# Altium PCB ublox_gnss_node.PcbDoc (part 2 of 5)
Units mm, origin at the board's own origin, x right, y up, seen from the top; angles counter-clockwise.
Board outline 84 x 108.04 mm, 6 copper layers (Top Layer (HSig), L2 GND, L3 Signal X, L4 PWR, L5 GND, Bottom Layer (Y)), stack 1.538 mm thick; 222 components, 159 nets, 892 pads, 1025 vias.
Unrouted connection lines stored in the file: 345.
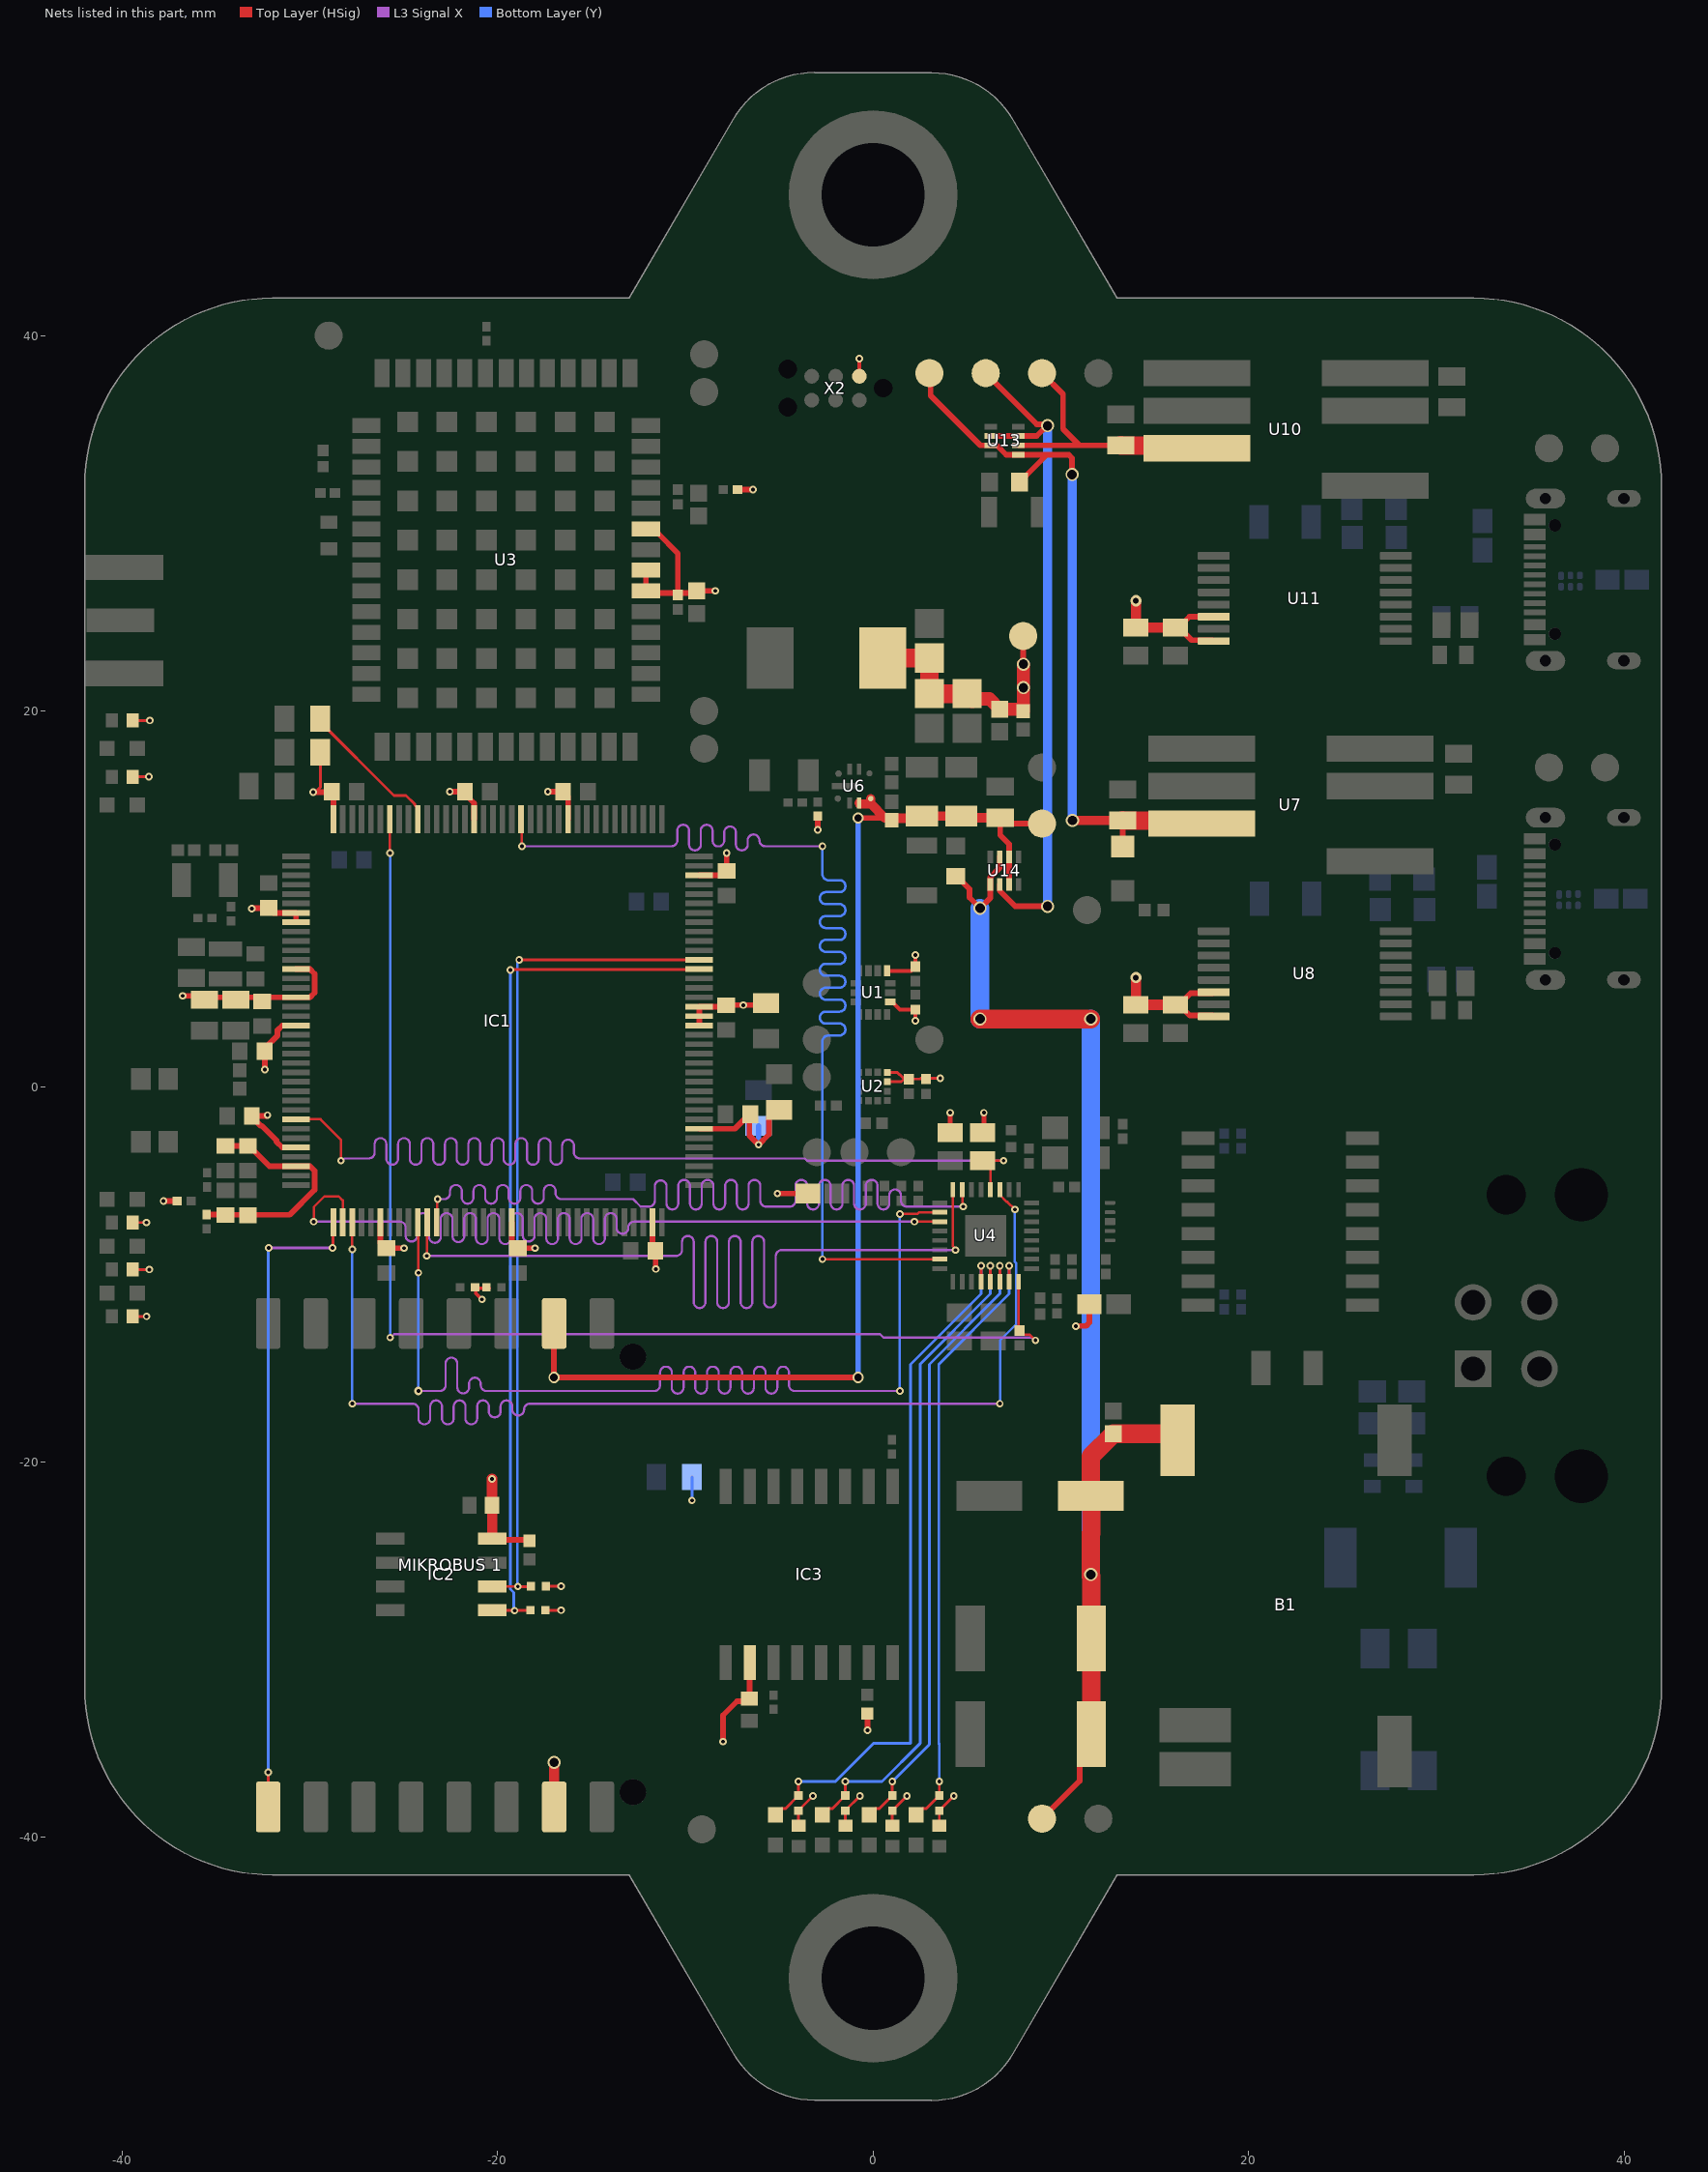
[diagram p6: the nets of this part, all layers, seen from the top]

## Part data
B1: "Power over Ethernet - PoE PD Module, Isolated DC-DC converter, IEEE802.3af compliant, Over Temp. Protection, Ind Temp. Range, Small Footprint, SMT. (Blocks not pins).", Manufacturer Name=Silvertel, Mouser Part Number=480-AG9905-MTB, Datasheet Link=https://www.silvertel.com/images/datasheets/Ag9900M-datasheet-ultra-miniature-isolated-Power-over-Ethernet-POE-module.pdf, Geometry.Height=13.05mm, Manufacturer Part Number=AG9905-MTB, Mouser Price/Stock=https://www.mouser.co.uk/ProductDetail/Silvertel/AG9905-MTB?qs=vvQtp7zwQdPQM58WrfW9tQ%3D%3D
C1 C4: library part CMP-1034-02114-1, "CAP 1uF  0402 (1005 Metric)", Case Code (Imperial)=0402, Case Code (Metric)=1005, Dielectric=X6S, Manufacturer=Murata, Manufacturer Part Number=GRM155C81C105KE11D, Max Operating Temperature=105°C, Min Operating Temperature=-55°C, Package Quantity=10000, Resistor Type=Ceramic, Supplier Part Number 1=490-12700-1-ND, Tolerance=10%, Voltage Rating=16V, Case/Package=0402, Category="Ceramic Capacitors", ComponentLink1Description=http://www.mouser.com/ds/2/281/c02e-2905.pdf?src-supplier=Mouser, ComponentLink1URL=http://www.mouser.com/ds/2/281/c02e-2905.pdf?src-supplier=Mouser, ComponentLink2Description=http://search.murata.co.jp/Ceramy/image/img/A01X/G101/ENG/GRM155C81C105KE11-01.pdf?src-supplier=Digi-Key, ComponentLink2URL=http://search.murata.co.jp/Ceramy/image/img/A01X/G101/ENG/GRM155C81C105KE11-01.pdf?src-supplier=Digi-Key, Height=0.5mm, Lead Free="Lead Free", Length=0.039inch, Mount="Surface Mount", Packaging="Tape and Reel", Pricing 1="1=0.29000, 10=0.19700, 50=0.11840, 100=0.09990, 500=0.06836, 1000=0.06047, 2500=0.05784, 5000=0.05258 (USD)", RoHS=Yes, RoHS Compliant=Yes, Stock 1=7199, Supplier 1=Digi-Key, Termination=SMD/SMT, Thickness=0.024inch, Voltage Rating (DC)=16V, Weight=0.000212oz, Width=0.5mm
C2 C3 C7 C9 C88: library part CMP-2008-03928-1, Manufacturer=Murata, Manufacturer Part Number=GRM155R71C104KA88J, Tolerance=10%, Part Number=GRM155R71C104KA88J
C5: library part CMP-1034-02087-2, Case Code (Imperial)=0402, Case Code (Metric)=1005, Dielectric=X7R, Manufacturer=Samsung, Manufacturer Part Number=CL05B224KO5NNNC, Max Operating Temperature=125°C, Min Operating Temperature=-55°C, Supplier Part Number=1276-1176-1-ND, Tolerance=10%, Voltage Rating=16V, Case/Package=0402, Category="Ceramic Capacitors", ComponentLink1Description=https://datasheet.ciiva.com/25800/cl05b224ko5nnnc-25800450.pdf?src-supplier=Digikey, ComponentLink1URL=https://datasheet.ciiva.com/25800/cl05b224ko5nnnc-25800450.pdf?src-supplier=Digikey, Construction=Flat, Depth=0.5mm, Height=0.5mm, Length=1mm, Material=4241ConductorMaterial, Mounting Technology="Surface Mount", Packaging="Tape and Reel", Pricing="1=0.1, 10=0.028, 50=0.0164, 100=0.0126, 500=0.0095, 1000=0.00747, 2500=0.00679, 5000=0.00625 (USD)", Radiation Hardening=No, RoHS=Yes, RoHS Compliant=Yes, Series=CL, Stock=1519601, Supplier=Digikey, Voltage Rating (DC)=16V
C8 C62 C63 C85: library part GRM188R61E106MA73D, "CAP CER 10UF 25V X5R 0603", Manufacturer=Murata, Supplier Part Number=490-7202-6-ND, Tolerance=20%, Category="Ceramic Capacitors", ComponentLink1Description=https://datasheet.ciiva.com/14906/partnumbering-e-01-14906429.pdf?src-supplier=Digi-Key, ComponentLink1URL=https://datasheet.ciiva.com/14906/partnumbering-e-01-14906429.pdf?src-supplier=Digi-Key, ComponentLink2Description=https://datasheet.ciiva.com/14906/partnumbering-e-01-14906431.pdf?src-supplier=Digi-Key, ComponentLink2URL=https://datasheet.ciiva.com/14906/partnumbering-e-01-14906431.pdf?src-supplier=Digi-Key, ComponentLink3Description=https://datasheet.ciiva.com/22776/608985-22776426.pdf?src-supplier=Farnell, ComponentLink3URL=https://datasheet.ciiva.com/22776/608985-22776426.pdf?src-supplier=Farnell, ComponentLink4Description=https://datasheet.ciiva.com/22776/c02e-22776427.pdf?src-supplier=Farnell, ComponentLink4URL=https://datasheet.ciiva.com/22776/c02e-22776427.pdf?src-supplier=Farnell, ComponentLink5Description=https://datasheet.ciiva.com/22619/c02e-22619674.pdf?src-supplier=Element14, ComponentLink5URL=https://datasheet.ciiva.com/22619/c02e-22619674.pdf?src-supplier=Element14, Manufacturer Part Number=GRM188R61E106MA73D, Pricing="1=0.26, 10=0.176, 50=0.1176, 100=0.0999, 500=0.07054, 1000=0.06173 (USD)", RoHS=Yes, Stock=3353344, Supplier=Digi-Key
C10 C12 C14: library part CL10B105KP8NNNC, "Capacitor 1uF 0603", Manufacturer_Name=SAMSUNG, Mouser Part Number=187-CL10B105KP8NNNC, Supplier Part Number 1=1276-1946-1-ND, Arrow Part Number=CL10B105KP8NNNC, Arrow Price/Stock=https://www.arrow.com/en/products/cl10b105kp8nnnc/samsung-electro-mechanics?region=europe, Datasheet Link=https://media.digikey.com/pdf/Data%20Sheets/Samsung%20PDFs/CL_Series_MLCC_ds.pdf, Height=0.9mm, Manufacturer Part Number=CL10B105KP8NNNC, Mouser Price/Stock=https://www.mouser.co.uk/ProductDetail/Samsung-Electro-Mechanics/CL10B105KP8NNNC?qs=X6jEic%2FHinD9krOsbkFZow%3D%3D, Supplier 1=Digikey
C11 C13 C16 C17 C18 C19 C20 C21 C22 C23 C24 C25 C28 C29 C30 C86 C87: library part CC0603KRX7R7BB104, "Capacitor 100nF 0603", Manufacturer_Name=YAGEO, Mouser Part Number=603-CC603KRX7R7BB104, Arrow Part Number=CC0603KRX7R7BB104, Arrow Price/Stock=https://www.arrow.com/en/products/cc0603krx7r7bb104/yageo?utm_currency=USD&region=europe, Datasheet Link=https://www.yageo.com/en/Chart/Download/pdf/CC0603KRX7R7BB104, Height=0.9mm, Manufacturer Part Number=CC0603KRX7R7BB104, Mouser Price/Stock=https://www.mouser.co.uk/ProductDetail/YAGEO/CC0603KRX7R7BB104?qs=AgBp2OyFlx8KPmNTlFoWXA%3D%3D, Supplier 1=Mouser, Supplier Part Number 1=603-CC603KRX7R7BB104
C15 C60 C61: library part CMP-2007-04522-1, Manufacturer="AVX Interconnect / Elco", Part Number=0805ZD226MAT2A
C26: library part 0603B221K500CT, "Capacitor 220pF 0603", Manufacturer_Name="Walsin Technology Corporation", Supplier Part Number 1=1292-1407-1-ND, Datasheet Link=http://www.passivecomponent.com/wp-content/uploads/datasheet/WTC_MLCC_General_Purpose.pdf, Height=0.87mm, Manufacturer Part Number=0603B221K500CT, Supplier 1=Digikey
C27 C32 C33 C66 C67 C74 C75: library part LMK212AB7106MG-T, "Capacitor 10uF 0805", Manufacturer_Name="TAIYO YUDEN", Mouser Part Number=963-LMK212AB7106MG-T, Supplier Part Number 1=587-3417-1-ND, Datasheet Link=https://datasheet.datasheetarchive.com/originals/distributors/Datasheets-DGA20/25674.pdf, Height=1.4mm, Manufacturer Part Number=LMK212AB7106MG-T, Mouser Price/Stock=https://www.mouser.co.uk/ProductDetail/Taiyo-Yuden/LMK212AB7106MG-T?qs=CNQs48zzdnrud19jlu61Cg%3D%3D, Supplier 1=Digikey
C31 C37 C41 C44 C45 C46 C47 C50 C55 C59 C64: library part GRM155R71H104KE14J, "Capacitor 100nF 0402 - storage", Case Code (Imperial)=0402, Case Code (Metric)=1005, Dielectric=X7R, Manufacturer=Murata, Max Operating Temperature=125°C, Min Operating Temperature=-55°C, Package Quantity=50000, Supplier Part Number 1=490-13342-1-ND, Tolerance=10%, Voltage Rating=50V, Case/Package=0402, Category="Ceramic Capacitors", ComponentLink1Description=http://search.murata.co.jp/Ceramy/image/img/A01X/G101/ENG/GRM155R71H104KE14-01.pdf?src-supplier=Mouser, ComponentLink1URL=http://search.murata.co.jp/Ceramy/image/img/A01X/G101/ENG/GRM155R71H104KE14-01.pdf?src-supplier=Mouser, ComponentLink2Description=http://search.murata.co.jp/Ceramy/image/img/A01X/G101/ENG/GRM155R71H104KE14-01.pdf?src-supplier=Digi-Key, ComponentLink2URL=http://search.murata.co.jp/Ceramy/image/img/A01X/G101/ENG/GRM155R71H104KE14-01.pdf?src-supplier=Digi-Key, ComponentLink3Description=http://search.murata.co.jp/Ceramy/image/img/A01X/G101/ENG/GRM155R71H104KE14-01.pdf?src-supplier=Avnet, ComponentLink3URL=http://search.murata.co.jp/Ceramy/image/img/A01X/G101/ENG/GRM155R71H104KE14-01.pdf?src-supplier=Avnet, ComponentLink4Description=http://search.murata.co.jp/Ceramy/image/img/A01X/G101/ENG/GRM155R71H104KE14-01.pdf?src-supplier=Avnet+Europe, ComponentLink4URL=http://search.murata.co.jp/Ceramy/image/img/A01X/G101/ENG/GRM155R71H104KE14-01.pdf?src-supplier=Avnet+Europe, Composition=Ceramic, Height=0.5mm, Lead Free="Lead Free", Length=0.039inch, Manufacturer Part Number=GRM155R71H104KE14J, Mount="Surface Mount", Packaging="Tape and Reel", Pricing 1="1=0.10000, 10=0.03800, 100=0.01680, 500=0.01198, 1000=0.00941, 2500=0.00855, 5000=0.00787 (USD)", RoHS=Yes, Stock 1=1916144, Supplier 1=Digi-Key, Termination=SMD/SMT, Thickness=0.022inch, Voltage Rating (DC)=50V, Weight=0.000212oz, Width=0.5mm
C34 C35: library part CMP-2008-04393-1, Manufacturer=Murata, Part Number=GRM1555C1H5R1CA01D
C36 C40 C53: library part GRM155R71H103KA88D, "Capacitor 10nF/50V 0402 - storage", Manufacturer_Name="Murata Electronics", Mouser Part Number=81-GRM155R71H103KA8D, Arrow Part Number=GRM155R71H103KA88D, Arrow Price/Stock=https://www.arrow.com/en/products/grm155r71h103ka88d/murata-manufacturing?utm_currency=USD&region=nac, Datasheet Link=https://search.murata.co.jp/Ceramy/image/img/A01X/G101/ENG/GRM155R71H103KA88-01A.pdf, Height=0.33mm, Manufacturer Part Number=GRM155R71H103KA88D, Mouser Price/Stock=https://www.mouser.co.uk/ProductDetail/Murata-Electronics/GRM155R71H103KA88D?qs=Dfh4SrgScWxOVlCuzd3ZyQ%3D%3D
C38 C42: library part GRM155R6YA105KE11D, "Capacitor 1uF/35V 0402 - storage", Manufacturer_Name="Murata Electronics", Mouser Part Number=81-GRM155R6YA105KE1D, Arrow Part Number=GRM155R6YA105KE11D, Arrow Price/Stock=https://www.arrow.com/en/products/grm155r6ya105ke11d/murata-manufacturing?region=europe, Datasheet Link=https://search.murata.co.jp/Ceramy/image/img/A01X/G101/ENG/GRM155R6YA105KE11-01A.pdf, Height=0.7mm, Manufacturer Part Number=GRM155R6YA105KE11D, Mouser Price/Stock=https://www.mouser.co.uk/ProductDetail/Murata-Electronics/GRM155R6YA105KE11D?qs=hNud%2FORuBR1Z%2F4J6kBsCGQ%3D%3D
C39 C43: library part GRM155R61A106ME11D, "Capacitor 10uF 0402 - storage", Manufacturer_Name="Murata Electronics", Mouser Part Number=81-GRM155R61A106ME1D, Arrow Part Number=GRM155R61A106ME11D, Arrow Price/Stock=https://www.arrow.com/en/products/grm155r61a106me11d/murata-manufacturing?utm_currency=USD&region=nac, Datasheet Link=https://search.murata.co.jp/Ceramy/image/img/A01X/G101/ENG/GRM155R61A106ME11-01A.pdf, Height=0.33mm, Manufacturer Part Number=GRM155R61A106ME11D, Mouser Price/Stock=https://www.mouser.co.uk/ProductDetail/Murata-Electronics/GRM155R61A106ME11D?qs=xZ%2FP%252Ba9zWqZMJSi57Q8OyA%3D%3D
C48 C49: library part C0402C220K5GACTU, "Capacitor 22pF 0402", Manufacturer_Name=KEMET, Mouser Part Number=80-C0402C220K5G, Arrow Part Number=C0402C220K5GACTU, Arrow Price/Stock=https://www.arrow.com/en/products/c0402c220k5gactu/kemet-corporation?region=nac, Datasheet Link=https://content.kemet.com/datasheets/KEM_C1002_X7R_SMD.pdf, Height=0.55mm, Manufacturer Part Number=C0402C220K5GACTU, Mouser Price/Stock=https://www.mouser.co.uk/ProductDetail/KEMET/C0402C220K5GACTU?qs=6dm3P68XlMDqaWSnHxY69A%3D%3D
C51 C52: library part CMP-1035-02328-1, "CAP 10nF 200V ±10% 0603 (1608 Metric) Thickness 1mm SMD", Case-EIA=0603, Case-Metric=1608, Manufacturer="Yageo Group", Manufacturer Part Number=C0603C103K2RAC, Rated Voltage="200 V", Tolerance=Â±10%, Max Thickness="1 mm", Technology=SMT
C54 C73 C81: library part CL31B102KJHNNNE, "Capacitor 1nF/2kV 3216 Isolated GND Loop Cap", Manufacturer_Name=SAMSUNG, Mouser Part Number=187-CL31B102KJHNNNE, Supplier Part Number 1=1276-3073-1-ND, Arrow Part Number=CL31B102KJHNNNE, Arrow Price/Stock=https://www.arrow.com/en/products/cl31b102kjhnnne/samsung-electro-mechanics?utm_currency=USD&region=nac, Datasheet Link=https://www.tme.com/Document/4a42202b32dab16128fe107dd69598cc/samsung-chip-cap.pdf, Height=1.8mm, Manufacturer Part Number=CL31B102KJHNNNE, Mouser Price/Stock=https://www.mouser.co.uk/ProductDetail/Samsung-Electro-Mechanics/CL31B102KJHNNNE?qs=X6jEic%2FHinAYVHtIjHgytw%3D%3D, Supplier 1=DigiKey
C56: library part GRM21BR61H475KE51L, "Capacitor 4.7uF/50V 0805", Manufacturer_Name="Murata Electronics", Mouser Part Number=81-GRM21BR61H475KE1L, Arrow Part Number=GRM21BR61H475KE51L, Arrow Price/Stock=https://www.arrow.com/en/products/grm21br61h475ke51l/murata-manufacturing?region=nac, Datasheet Link=https://search.murata.co.jp/Ceramy/image/img/A01X/G101/ENG/GRM21BR61H475KE51-01A.pdf, Height=1.45mm, Manufacturer Part Number=GRM21BR61H475KE51L, Mouser Price/Stock=https://www.mouser.co.uk/ProductDetail/Murata-Electronics/GRM21BR61H475KE51L?qs=eeBpzGFlv%252B%252BOtLzDC1PY6Q%3D%3D
C57 C58 C65: library part CMP-2000-06011-1, "Capacitor 1uF/50V 0801", Capacitance=1uF, Capacitance - nF=1000nF, Case Code - in=1206, Case Code - mm=3216, Case Height=1mm, Case Length=3.2mm, Case Width=1.6mm, Dielectric=X7R, Manufacturer=Kemet, Manufacturer Part Number=C1206C105K5RACTU, Maximum Operating Temperature=+125C, Minimum Operating Temperature=-55C, Operating Temperature Range=-55Cto+125C, Package / Case=1206(3216metric), Package Description="2-Pin Surface Mount Device, Body 3.2 x 1.6 mm", Supplier Part Number 1=399-C1206C105K5RACTUTR-ND, Temperature Coefficient / Code=+/-15%, Tolerance=10%, Voltage Rating=50V, Brand=Kemet, Class=Class1, Datasheet URL=http://www.kemet.com/docfinder?Partnumber=C1206C105K5RACTU, Datasheet Version=02/2016, Dimensions=1.6mmWx3.2mmLx1mmH, Factory Pack Quantity=2500, Manufacturer URL=http://www.kemet.com/, Mounting Technology=SurfaceMount, Package Reference=1206, Packaging=Reel, Product=GeneralTypeMLCCs, Product Category=MultilayerCeramicCapacitorsMLCC-SMD/SMT, RoHS=Details, Series=C1206C, Supplier 1=DigiKey, Termination Style=SMD/SMT, Type=SMDMLCCX7R6.3-250VDCCommericalGrade, Voltage Rating DC=50V
C68 C76: library part CL10B475KQ8NQNC, "Capacitor 4.7uF 0603", Manufacturer_Name=SAMSUNG, Mouser Part Number=187-CL10B475KQ8NQNC, Supplier Part Number 1=1276-2087-1-ND, Arrow Part Number=CL10B475KQ8NQNC, Arrow Price/Stock=https://www.arrow.com/en/products/cl10b475kq8nqnc/samsung-electro-mechanics, Datasheet Link=https://datasheet.datasheetarchive.com/originals/distributors/Datasheets-DGA10/2410603.pdf, Height=0.95mm, Manufacturer Part Number=CL10B475KQ8NQNC, Mouser Price/Stock=https://www.mouser.co.uk/ProductDetail/Samsung-Electro-Mechanics/CL10B475KQ8NQNC?qs=6tbHoouHnQxd6rcaSwpT7Q%3D%3D, Supplier 1=Digikey
C69 C70 C71 C72 C77 C78 C79 C80: library part CMP-2007-00235-2, "Capacitor 1nF 0805", Capacitance="1,000 pF", Manufacturer=KEMET, Manufacturer Part Number=C0805C102J5GACTU, Package=C0805C-DN, Supplier Part Number 1=80-C0805C102J5G, Temperature="-55°C to +125°C", Temperature Characteristic=C0G, Temperature Coefficient=30ppm/°C, Temperature Range High=+125°C, Temperature Range Low=-55°C, Tolerance=0.05, Voltage Rating="50 V", Automotive=No, Category=Cap, ComponentLink2Description=Datasheet, ComponentLink2URL=https://content.kemet.com/datasheets/KEM_C1003_C0G_SMD.pdf, Device Class L1="Passive Components", Device Class L2=Capacitors, Device Class L3="Ceramic Capacitors", Digikey Description="CAP CER 1000PF 50V C0G/NP0 0805", Height=0.88mm, Ipc Land Pattern Name=CAPC200125X78, Lead Free=Yes, Material=Ceramic, Mouser Description="Multilayer Ceramic Capacitors MLCC - SMD/SMT 50volts 1000pF C0G 5%", Octopart=https://octopart.com/c0805c102j5gactu-kemet-97757, RoHS=TRUE, Supplier 1=Mouser
C82 C83: library part CMP-2006-03061-2, "Capacitor 100nF 0603", Capacitance="0.10 μF", Manufacturer=KEMET, Manufacturer Part Number=C0603C104K5RACTU, Package=C0603C-CF, Supplier Part Number 1=80-C0603C104K5R7867, Temperature="-55°C to +125°C", Temperature Characteristic=X7R, Temperature Coefficient=30ppm/°C, Temperature Range High=+125°C, Temperature Range Low=-55°C, Tolerance=0.1, Voltage Rating="50 V", Automotive=Yes, Automotive Grade="Grade 1", Category=Cap, ComponentLink2Description=Datasheet, ComponentLink2URL=https://api.kemet.com/component-edge/download/datasheet/C0603C100J5GACAUTO.pdf, Device Class L1="Passive Components", Device Class L2=Capacitors, Device Class L3="Ceramic Capacitors", Digikey Description="CAP CER 0.1UF 50V X7R 0603", Height=0.87mm, Lead Free=Yes, Material=Ceramic, Octopart=https://octopart.com/c0603c104k5ractu-kemet-139244, RoHS=TRUE, Supplier 1=Mouser
C84: library part CMP-0687-00063-1, "Aluminum Electrolytic Capacitor, UD Series, Low Impedance, 100 uF, 25 V, + / - 20%, -55 to 105 degC, Chip Type, 6.3 x 7.7 mm D x L, Pb-Free, Reel", Manufacturer=Nichicon, PartNumber=UUD1E101MCL1GS, Rated Capacitance="100 uF", Rated Ripple Current (at 100kHz)="280 mA", Rated Voltage="25 V", Tolerance Rated Capacitance="-20 to 20%", ComponentLink1Description="Manufacturer URL", ComponentLink1URL=http://www.nichicon.co.jp/, ComponentLink2Description=Datasheet, ComponentLink2URL=http://products.nichicon.co.jp/en/pdf/XJA043/e-ud.pdf, ComponentLink3Description="Package Specification", ComponentLink3URL=http://products.nichicon.co.jp/en/pdf/XJA043/e-ud.pdf, DatasheetVersion=08/2012, Diameter="6.3 mm", Endurance Time="2000 h", Impedance="0.34 Ohm", Length="7.7 mm", Mounting Technology="Surface Mount", PackageDescription="2-Pin Surface Mount Device, Diameter 6.3 mm, Height 7.7 mm, Pitch 5.4 mm", PackageReference=CAPAE-D6.3H7.7, Packing="Dia382mm Reel", RoHS=TRUE
D1 D2 D5 D8: library part CMP-1426-00006-7, "WURTH ELEKTRONIK - 150060VS75000 - LED, Green, SMD, 0603, 30 mA, 2 V, 570 nm", Case Code (Imperial)=0603, Case Code (Metric)=1608, Color=Green, Forward Current=100mA, Forward Voltage=2V, Max Junction Temperature (Tj)=95°C, Max Operating Temperature=85°C, Max Reverse Voltage (DC)=5V, Min Operating Temperature=-40°C, Power Dissipation=72mW, Supplier Part Number=8154215P, Test Current=20mA, Case/Package=0603, Dominant Wavelength=570nm, Height=700µm, Length=1.6mm, Lens Style="Clear, Rectangular", Luminous Intensity=40mcd, Mount="Surface Mount", Number of Pins=2, Packaging="Tape and Reel", Peak Wavelength=572nm, REACH SVHC=Unknown, Reverse Voltage=5V, RoHS=Compliant, Supplier=RS, Viewing Angle=140°, Wavelength=570nm, Width=800µm
D3 D6 D9: library part CMP-1426-00005-3, "WL-SMCW SMT Mono-Color Chip LED Waterclear", Case Code (Imperial)=0603, Case Code (Metric)=1608, Color=Yellow, Forward Current=100mA, Forward Voltage=2V, Max Junction Temperature (Tj)=95°C, Max Operating Temperature=85°C, Max Reverse Voltage (DC)=5V, Min Operating Temperature=-40°C, Power Dissipation=72mW, Supplier Part Number=150060YS75000, Test Current=20mA, Case/Package=0603, Dominant Wavelength=590nm, Height=700µm, Length=1.6mm, Lens Style="Clear, Rectangular", Luminous Intensity=120mcd, Mount="Surface Mount", Packaging="Tape and Reel", Peak Wavelength=595nm, REACH SVHC=Unknown, Reverse Voltage=5V, RoHS=Compliant, Supplier=Farnell, Viewing Angle=140°, Wavelength=590nm, Width=800µm
D4 D7: library part CMP-1426-00001-4, "LED Low-Power Uni-Color Red 630nm 2V 2-Pin Chip 0603(1608Metric) T/R", Case Code (Imperial)=0603, Case Code (Metric)=1608, Color=Red, Forward Current=100mA, Forward Voltage=2V, Max Junction Temperature (Tj)=95°C, Max Operating Temperature=85°C, Max Reverse Voltage (DC)=5V, Min Operating Temperature=-40°C, Power Dissipation=72mW, Supplier Part Number=150060RS75000, Test Current=20mA, Case/Package=0603, Dominant Wavelength=625nm, Height=700µm, Length=1.6mm, Lens Style="Clear, Rectangular", Luminous Intensity=250mcd, Mount="Surface Mount", Packaging="Tape and Reel", Peak Wavelength=630nm, REACH SVHC=Unknown, Reverse Voltage=5V, RoHS=Compliant, Supplier=Farnell, Viewing Angle=140°, Wavelength=625nm, Width=800µm
D10: library part CMP-02577-000016-1, "TVS DIODE 58V 93.6V DO214AB", Breakdown Voltage=64.4V, Clamping Voltage=93.6V, Manufacturer="Vishay Semiconductor Diodes Division", Max Junction Temp=+150°C, Package=95402, Peak Pulse Current=16A, Peak Pulse Power=1500W, Reverse Standoff Voltage=58V, Temperature="-55°C to +150°C", Temperature Range Low=-55°C, Automotive=No, Automotive Grade=NA, Category=Diode, ComponentLink2Description=Datasheet, ComponentLink2URL=https://www.vishay.com/docs/88394/smcj.pdf, Device Class L1="Circuit Protection", Device Class L2="TVS Diodes", Device Class L3=unset, Digikey Description="TVS DIODE 58V 93.6V DO214AB", Direction=Bidirectional, Footprint Url=http://www.vishay.com/docs/95402/smc.pdf, Height=2.62mm, Lead Free=Yes, Manufacturer Part Number=SMCJ58CA-E3/57T, Mouser Description="TVS Diodes - Transient Voltage Suppressors 1500W 58V Bidirect", Number of Channels=1, Octopart=https://octopart.com/smcj58ca-e3%2F57t-vishay-39599086, RoHS=TRUE, Standoff Height=0mm, Temperature Range High=+150°C
D11: library part CMP-07163-000033-1, "BRIDGE RECT 1P 400V 500MA 4SOIC", Capacitance=13pF, Forward Current=0.5A, Manufacturer="ON Semiconductor", Max Junction Temp=+150°C, Max Repetitive Reverse Voltage=400V, Max Surge Forward Current=35A, Package=751EP, Peak Reverse Current=5uA, Temperature="-55°C to +150°C", Temperature Range Low=-55°C, Automotive=No, Category=Diode, ComponentLink2Description=Datasheet, ComponentLink2URL=https://www.onsemi.com/pub/Collateral/MB8S-D.PDF, Device Class L1="Discrete Semiconductors", Device Class L2=Diodes, Device Class L3="Rectifier Diodes", Digikey Description="BRIDGE RECT 1P 400V 500MA 4SOIC", Height=2.9mm, Ipc Land Pattern Name=SOIC254P670X265-4, Lead Free=Yes, Manufacturer Part Number=MB4S, Mouser Description="Bridge Rectifiers 0.5A Bridge", Octopart=https://octopart.com/mb4s-on+semiconductor-84329762, Reverse Voltage=400V, RoHS=TRUE, Standoff Height=0.05mm, Temperature Range High=+150°C
FB1 FB2: library part CMP-0686-00581-3, "Chip Ferrite Bead, 0603, 600Ω @ 100MHz, 0.15Ω, 25%, 1.3A", Case Code (Imperial)=0603, Case Code (Metric)=1608, Current Rating=1.3A, DC Resistance (DCR)=150mR, Inductor Type="FERRITE BEAD", Max Operating Temperature=125°C, Min Operating Temperature=-55°C, Package Quantity=1, Supplier Part Number 1=490-5258-1-ND, Test Frequency=100MHz, Tolerance=25%, Case/Package=0603, Core Material=Ferrite, DC Current=1.3A, Depth=0.8mm, Height=0.8mm, Impedance=600R, Lead Free="Lead Free", Length=1.6mm, Manufacturer Part Number=BLM18KG601SN1D, Material=Steel, Max Current Rating=1.3A, Max DC Current=1.3A, Military Standard=Not, Number of Circuits=1, Number of Lines=1, Number of Pins=2, Packaging="Tape and Reel", Radiation Hardening=No, REACH SVHC="No SVHC", RoHS Compliant=Yes, Series=BLM18K, Supplier 1=Digikey, Termination=SMD/SMT, Weight=7.1E-05oz, Width=0.8mm
FB3 FB4 FB5 FB6: library part CMP-0686-00581-3, "Chip Ferrite Bead, 0603, 600Ω @ 100MHz, 0.15Ω, 25%, 1.3A", Case Code (Imperial)=0603, Case Code (Metric)=1608, Current Rating=1.3A, DC Resistance (DCR)=150mR, Inductor Type="FERRITE BEAD", Max Operating Temperature=125°C, Min Operating Temperature=-55°C, Package Quantity=1, Test Frequency=100MHz, Tolerance=25%, Case/Package=0603, Core Material=Ferrite, DC Current=1.3A, Depth=0.8mm, Height=0.8mm, Impedance=600R, Lead Free="Lead Free", Length=1.6mm, Material=Steel, Max Current Rating=1.3A, Max DC Current=1.3A, Military Standard=Not, Number of Circuits=1, Number of Lines=1, Number of Pins=2, Packaging="Tape and Reel", Radiation Hardening=No, REACH SVHC="No SVHC", RoHS Compliant=Yes, Series=BLM18K, Termination=SMD/SMT, Weight=7.1E-05oz, Width=0.8mm
IC1: "STM32H755 MCU", Manufacturer_Name=STMicroelectronics, Mouser Part Number=511-STM32H755ZIT6U, Datasheet Link=https://www.st.com/resource/en/datasheet/stm32h755zi.pdf, Height=1.6mm, Manufacturer Part Number=STM32H755ZIT6U, Mouser Price/Stock=https://www.mouser.com/Search/Refine.aspx?Keyword=511-STM32H755ZIT6U, Supplier 1=Heisener, Supplier Part Number 1=STM32H755ZIT6U
IC2: "EEPROM ST 64kbit I2C", Manufacturer_Name=STMicroelectronics, Mouser Part Number=511-M24C64-FMN6TP, Arrow Part Number=M24C64-FMN6TP, Arrow Price/Stock=https://www.arrow.com/en/products/m24c64-fmn6tp/stmicroelectronics?utm_currency=USD&region=europe, Datasheet Link=https://www.st.com/resource/en/datasheet/m24c64-f.pdf, Height=1.75mm, Manufacturer Part Number=M24C64-FMN6TP, Mouser Price/Stock=https://www.mouser.co.uk/ProductDetail/STMicroelectronics/M24C64-FMN6TP?qs=bKyP%252BnDORLFSmkTpM6wmYg%3D%3D
IC3: "NOR Flahs 512MBit QSPI Macronix", Manufacturer_Name=Macronix, Arrow Part Number=MX25L51245GMI-08G, Arrow Price/Stock=https://www.arrow.com/en/products/mx25l51245gmi-08g/macronix-international?region=nac, Datasheet Link=https://datasheet.datasheetarchive.com/originals/dk/DKDS-14/274585.pdf, Height=2.65mm, Manufacturer Part Number=MX25L51245GMI-08G
J1: library part CMP-02754-000006-1, "CONN SMA JACK STR 50OHM EDGE MNT", Case/Package=SMA, Dielectric Material=PTFE, Housing Color=Gold, Max Frequency=6GHz, Max Operating Temperature=125°C, Min Operating Temperature=-65°C, Package Quantity=1, Voltage Rating=335V, Body Material=Brass, Body Plating=Gold, Center Contact Plating=Gold, Connector Type=SMA, Contact Material=Copper, Contact Plating=Gold, Depth=13.33mm, Fastening Type=Threaded, Impedance=50R, Insulation Material=Polytetrafluoroethylene, Length=6.35mm, Mount=Edge, Orientation=Straight, Packaging=Tray, Radiation Hardening=No, RoHS Compliant=Yes, Series=SMA, Supplier=Avnet, Supplier Part Number=SMA-J-P-H-ST-EM1, Termination=Solder
J2 J3: "USB2.0, Type C, Top mount, CH 1.68mm, Dual Row SMT", Package=None, Supplier Part Number 1=664-12402012E212ACT-ND, Availability="In Stock", Check_prices=https://www.snapeda.com/parts/12402012E212A/Amphenol/view-part/?ref=eda, Manufacturer Part Number=12402012E212A, MF="Amphenol ICC (Commercial Products)", MP=12402012E212A, Price=None, Purchase-URL=https://pricing.snapeda.com/search/part/12402012E212A/?ref=eda, SnapEDA_Link=https://www.snapeda.com/parts/12402012E212A/Amphenol/view-part/?ref=snap, Supplier 1=Digikey
L1: library part CMP-06042-015783-1, "Multilayer type RF Inductor 47nH ±5% 0.72Ω 300mA 0402", Case Code (Imperial)=0402, Case Code (Metric)=1005, Current Rating=200mA, DC Resistance (DCR)=720mR, Manufacturer=Murata, Max Operating Temperature=125°C, Min Operating Temperature=-55°C, Package Quantity=1, RMS Current (Irms)=300mA, Self Resonant Frequency=1GHz, Supplier Part Number=490-2631-6-ND, Test Frequency=100MHz, Tolerance=5%, Case/Package=0402, Category="Fixed Inductors", ComponentLink1Description=https://datasheet.ciiva.com/11799/0900766b8090d685-11799071.pdf?src-supplier=Rs, ComponentLink1URL=https://datasheet.ciiva.com/11799/0900766b8090d685-11799071.pdf?src-supplier=Rs, ComponentLink2Description=https://datasheet.ciiva.com/18088/getdatasheetpartid-55809-18088839.pdf?src-supplier=Verical, ComponentLink2URL=https://datasheet.ciiva.com/18088/getdatasheetpartid-55809-18088839.pdf?src-supplier=Verical, ComponentLink3Description=https://datasheet.ciiva.com/1038/l0075s0083lqg15hs-1038337.pdf?src-supplier=Digikey, ComponentLink3URL=https://datasheet.ciiva.com/1038/l0075s0083lqg15hs-1038337.pdf?src-supplier=Digikey, ComponentLink4Description=https://datasheet.ciiva.com/1038/l0075s0083lqg15hs-1038338.pdf?src-supplier=Digikey, ComponentLink4URL=https://datasheet.ciiva.com/1038/l0075s0083lqg15hs-1038338.pdf?src-supplier=Digikey, ComponentLink5Description=https://datasheet.ciiva.com/1038/l0075s0083lqg15hs-1038339.pdf?src-supplier=Digikey, ComponentLink5URL=https://datasheet.ciiva.com/1038/l0075s0083lqg15hs-1038339.pdf?src-supplier=Digikey, ComponentLink6Description=https://datasheet.ciiva.com/4977/o05e-4977919.pdf?src-supplier=Mouser, ComponentLink6URL=https://datasheet.ciiva.com/4977/o05e-4977919.pdf?src-supplier=Mouser, Core Material=Air, DC Current=200mA, Depth=0.55mm, ESR=720mR, Height=0.5mm, Height - Seated (Max)=0.022inch, Lead Free="Lead Free", Length=1mm, Manufacturer Part Number=LQG15HS47NJ02D, Max DC Current=200mA, Military Standard=Not, Mount="Surface Mount", Packaging="Tape and Reel", Pricing="1=0.1, 10=0.049, 25=0.0448, 50=0.0396, 100=0.0346, 250=0.03296, 500=0.03098, 1000=0.02373, 2500=0.02241 (USD)", Q Factor=8, Radiation Hardening=No, Rated Current-Max=200mA, RoHS=Yes, Series=LQG15HS, Shielding=Unshielded, Stock=40426, Supplier=Digikey, Termination=SMD/SMT, Width=0.02inch
L2: library part LQM2MPN2R2MG0L, "Inductor", Manufacturer_Name="Murata Electronics", Mouser Part Number=81-LQM2MPN2R2MG0L, Arrow Part Number=LQM2MPN2R2MG0L, Arrow Price/Stock=https://www.arrow.com/en/products/lqm2mpn2r2mg0l/murata-manufacturing?utm_currency=USD&region=nac, Datasheet Link=https://search.murata.co.jp/Ceramy/image/img/P02/JELF243B-0022.pdf, Height=1mm, Manufacturer Part Number=LQM2MPN2R2MG0L, Mouser Price/Stock=https://www.mouser.co.uk/ProductDetail/Murata-Electronics/LQM2MPN2R2MG0L?qs=YinlzBdtFMj9%2Fj5t8GanUg%3D%3D, Supplier 1=Mouser, Supplier Part Number 1=81-LQM2MPN2R2MG0L
L3: library part DR73-6R8-R, "Inductor 6.8uH 2.55A 43.5 MOHM", Manufacturer_Name=Eaton, Mouser Part Number=704-DR73-6R8-R, Arrow Part Number=DR73-6R8-R, Arrow Price/Stock=https://www.arrow.com/en/products/dr73-6r8-r/eaton?utm_currency=USD&region=nac, Datasheet Link=https://www.eaton.com/content/dam/eaton/products/electronic-components/resources/data-sheet/eaton-dr-high-power-density-high-efficiency-shielded-drum-core-power-inductors-data-sheet.pdf, Height=3.55mm, Manufacturer Part Number=DR73-6R8-R, Mouser Price/Stock=https://www.mouser.co.uk/ProductDetail/Eaton-Electronics/DR73-6R8-R?qs=yzwxPInThYRgvP%252Bo5UKn2A%3D%3D
"MIKROBUS 1": library part "MIKROBUS HOST CONN._1", "mikroBUS Host Socket", Supplier Part Number=1471-MIKROE-5210-ND, SMD=No, Supplier=DigiKey
R1: library part CMP-2002-07567-1, Manufacturer="Yageo / Phycomp", Part Number=RC0402FR-072K2L
R2 R16 R17 R18 R22 R27 R38 R39 R44 R50 R51: library part CMP-2002-03041-1, "Resistor 0R 0402", Case Code (Imperial)=0402, Case Code (Metric)=1005, Manufacturer="Vishay Dale", Manufacturer Part Number=CRCW04020000Z0EDHP, Max Operating Temperature=155°C, Max Power Dissipation=125mW, Min Operating Temperature=-55°C, Package Quantity=1, Power Rating=200mW, Supplier Part Number 1=541-0.0YBCT-ND, Temperature Coefficient=0ppm/°C, Voltage Rating=50V, Case/Package=0402, Category="Chip SMD Resistors", ComponentLink1Description=https://datasheet.ciiva.com/16494/crcwhpe3-16494453.pdf?src-supplier=Future+Electronics, ComponentLink1URL=https://datasheet.ciiva.com/16494/crcwhpe3-16494453.pdf?src-supplier=Future+Electronics, ComponentLink2Description=https://datasheet.ciiva.com/2470/crcwhpe3-2470555.pdf?src-supplier=Digi-Key, ComponentLink2URL=https://datasheet.ciiva.com/2470/crcwhpe3-2470555.pdf?src-supplier=Digi-Key, ComponentLink3Description=https://datasheet.ciiva.com/5562/crcwhpe3-46056-5562315.pdf?src-supplier=Mouser, ComponentLink3URL=https://datasheet.ciiva.com/5562/crcwhpe3-46056-5562315.pdf?src-supplier=Mouser, ComponentLink4Description=https://datasheet.ciiva.com/9109/crcwhpe3-9109963.pdf?src-supplier=Avnet, ComponentLink4URL=https://datasheet.ciiva.com/9109/crcwhpe3-9109963.pdf?src-supplier=Avnet, ComponentLink5Description=https://datasheet.ciiva.com/2470/crcwhpe3-2470556.pdf?src-supplier=Digi-Key, ComponentLink5URL=https://datasheet.ciiva.com/2470/crcwhpe3-2470556.pdf?src-supplier=Digi-Key, ComponentLink6Description=https://datasheet.ciiva.com/28621/1912814-28621324.pdf?src-supplier=Element14, ComponentLink6URL=https://datasheet.ciiva.com/28621/1912814-28621324.pdf?src-supplier=Element14, ComponentLink7Description=https://datasheet.ciiva.com/2470/crcwhpe3-2470557.pdf?src-supplier=Digi-Key, ComponentLink7URL=https://datasheet.ciiva.com/2470/crcwhpe3-2470557.pdf?src-supplier=Digi-Key, ComponentLink8Description=https://datasheet.ciiva.com/7725/crcwhpe3-7725758.pdf?src-supplier=Element14, ComponentLink8URL=https://datasheet.ciiva.com/7725/crcwhpe3-7725758.pdf?src-supplier=Element14, Composition="Thick Film", Contact Plating=Tin, Depth=0.5mm, Features="Automotive AEC-Q200", Height=0.3mm, Lead Free="Lead Free", Length=1mm, Military Standard=Not, Mount="Surface Mount", Number of Terminations=2, Packaging="Tape and Reel", Part Number=CRCW04020000Z0EDHP, Pricing 1="1=0.13000, 10=0.11300, 25=0.07840, 50=0.06080, 100=0.04350, 250=0.03388, 500=0.02694, 1000=0.01912, 5000=0.01477 (USD)", Radiation Hardening=No, REACH SVHC=Unknown, RoHS=Yes, Stock 1=527407, Supplier 1=Digi-Key, Termination=SMD/SMT, Voltage Rating (DC)=50V, Weight=2.3E-05oz, Width=0.02inch
R3: library part CMP-1659-00008-4, "Chip Resistor, 10 Ohm, +/- 1%, 0.1 W, -55 to 155 degC, 0603 (1608 Metric), RoHS, Tape and Reel", Case Code (Imperial)=0603, Case Code (Metric)=1608, Manufacturer=Yageo, Manufacturer Part Number=CR0603-FX-10R0ELF, Max Operating Temperature="155 degC", Max Power Dissipation=100mW, Min Operating Temperature="-55 degC", Package Quantity=200, Resistance Tolerance=1%, Resistor Type="Thick Film", Supplier Part Number=CR0603-FX-10R0ELFCT-ND, Temperature Coefficient=100ppm/°C, Voltage Rating="50 V", Voltage Rating (DC)=50V, Case/Package=0603, Category="Chip SMD Resistors", ComponentLink1Description="Manufacturer URL", ComponentLink1URL=http://www.yageo.com/, ComponentLink2Description=Datasheet, ComponentLink2URL=http://www.yageo.com/documents/recent/PYu-RC_Group_51_RoHS_L_04.pdf, ComponentLink3Description="Package Specification", ComponentLink3URL=http://www.farnell.com/datasheets/443971.pdf, ComponentLink4Description=https://datasheet.ciiva.com/11808/0900766b80fcdb72-11808034.pdf?src-supplier=Rs, ComponentLink4URL=https://datasheet.ciiva.com/11808/0900766b80fcdb72-11808034.pdf?src-supplier=Rs, ComponentLink5Description=https://datasheet.ciiva.com/41449/001055487-da-01-en-smd-wid-cr0603-fx-10r0elf-10-ohm-1-10w-41449967.pdf?src-supplier=Conrad, ComponentLink5URL=https://datasheet.ciiva.com/41449/001055487-da-01-en-smd-wid-cr0603-fx-10r0elf-10-ohm-1-10w-41449967.pdf?src-supplier=Conrad, ComponentLink6Description=https://datasheet.ciiva.com/7001/1902866-7001627.pdf?src-supplier=Newark, ComponentLink6URL=https://datasheet.ciiva.com/7001/1902866-7001627.pdf?src-supplier=Newark, ComponentLink7Description=https://datasheet.ciiva.com/5549/chpreztr-26488-5549959.pdf?src-supplier=Mouser, ComponentLink7URL=https://datasheet.ciiva.com/5549/chpreztr-26488-5549959.pdf?src-supplier=Mouser, ComponentLink8Description=https://datasheet.ciiva.com/7986/1902866-7986159.pdf?src-supplier=Element14, ComponentLink8URL=https://datasheet.ciiva.com/7986/1902866-7986159.pdf?src-supplier=Element14, ComponentLink9Description=https://datasheet.ciiva.com/22713/691949-22713210.pdf?src-supplier=Element14, ComponentLink9URL=https://datasheet.ciiva.com/22713/691949-22713210.pdf?src-supplier=Element14, ComponentLink10Description=https://datasheet.ciiva.com/46383/1791942-46383781.pdf?src-supplier=Element14, ComponentLink10URL=https://datasheet.ciiva.com/46383/1791942-46383781.pdf?src-supplier=Element14, Contact Plating=Tin, DatasheetVersion="Rev. 4, 02/2016", Depth=0.8mm, Features="Moisture Resistant", Height="0.45 mm", Length="1.6 mm", Mount="Surface Mount", Mounting Technology="Surface Mount", Number of Terminations=2, PackageDescription="2-Pin Surface Mount Device, Body 1.6 x 0.8 mm", PackageReference=0603, Packaging="Tape and Reel", Pins=2, Power Rating=100mW, Pricing="1=0.1, 10=0.015, 50=0.009, 100=0.0075, 500=0.00498, 1000=0.00425 (USD)", Radiation Hardening=No, REACH SVHC="No SVHC", Reach SVHC Compliant=No, RoHS=Yes, RoHS Compliant=Yes, RoHSCompliant=true, Series=CR0603, Stock=259694, Supplier=Digikey, Technology="THICK FILM", Termination=SMD/SMT, Thickness=457um, Tolerance=1%, Width=0.8mm
R4 R5 R6 R7 R8 R9 R10 R11 R12: library part CMP-1011-00062-1, "330R 0.063W 5% 0402 (1005 Metric)  SMD", Case-EIA=0402, Case-Metric=1005, Power="0.063 W", Supplier Part Number=CRCW0402330RJNTD-ND, Tolerance="5 %", Supplier=DigiKey, Technology=SMT
R13 R14 R15 R24 R25 R26 R28: library part ERJ-6GEYJ103V, "Resistor 10k 0805", Manufacturer_Name=Panasonic, Mouser Part Number=667-ERJ-6GEYJ103V, Supplier Part Number 1=71-CRCW0603-10K-E3, Arrow Part Number=ERJ-6GEYJ103V, Arrow Price/Stock=https://www.arrow.com/en/products/erj6geyj103v/panasonic?region=nac, Datasheet Link=https://datasheet.datasheetarchive.com/originals/distributors/DKDS40/DSANUWW0010911.pdf, Height=0.7mm, Manufacturer Part Number=ERJ-6GEYJ103V, Mouser Price/Stock=https://www.mouser.co.uk/ProductDetail/Panasonic/ERJ-6GEYJ103V?qs=tQNqqtTOejK5rw%252BRxJVxUA%3D%3D, Supplier 1=Mouser, Supplier 2=Digikey, Supplier Part Number 2=P10KADKR-ND
R19 R20 R21 R23 R58 R59 R60 R61: library part CMP-1011-00090-2, Manufacturer="Vishay Dale", Part Number=CRCW04024K70JNTD
R29 R30 R31 R35: library part CMP-2001-00613-1, "Resistor 2k2 0603", Manufacturer=Panasonic, Manufacturer Part Number=ERA6AEB222V, Supplier Part Number 1=603-RC0603FR-072K2L, Supplier 1=Mouser
R32 R33: library part CMP-009-00183-1, "Resistor 0R 0402", Case/Package=0402, Manufacturer="Vishay Dale", Manufacturer Part Number=CRCW04020000Z0EDHP, Max Operating Temperature=155°C, Min Operating Temperature=-55°C, Power=200mW, Supplier Part Number 1=541-0.0YBCT-ND, Component Type=Resistors, Mounting Technology="Surface Mount", Pins=2, RoHS Compliant=Yes, Supplier 1=Digikey
R34: library part CMP-2002-00186-1, "Resistor 6k49 0402 1%", Manufacturer="Vishay Dale", Manufacturer Part Number=CRCW04026K49FKED, Supplier Part Number 1=71-CRCW0402-6.49K-E3, Supplier 1=Mouser
R36 R37: library part CMP-2001-00665-1, "Resistor 75R 0805", Manufacturer Part Number=ERA6AEB750V, Supplier Part Number 1=667-ERA-6AEB750V, Part Number=ERA6AEB750V, Supplier 1=Mouser
R40 R42 R43 R46 R47: library part ERJ-UP6D5101V, "Resistor 5k1 0805", Manufacturer_Name=Panasonic, Mouser Part Number=667-ERJ-UP6D5101V, Arrow Part Number=ERJ-UP6D5101V, Arrow Price/Stock=https://www.arrow.com/en/products/erj-up6d5101v/panasonic?utm_currency=USD&region=nac, Datasheet Link=https://industrial.panasonic.com/cdbs/www-data/pdf/RDP0000/AOA0000C337.pdf, Height=0.7mm, Manufacturer Part Number=ERJ-UP6D5101V, Mouser Price/Stock=https://www.mouser.co.uk/ProductDetail/Panasonic/ERJ-UP6D5101V?qs=ZcfC38r4Pouz7%2FLHthUDHQ%3D%3D, Supplier 1=Mouser, Supplier Part Number 1=667-ERJ-UP6D5101V
R41 R48 R49: library part CMP-2002-00433-1, "Resistor 10k 0402", Manufacturer=Panasonic, Manufacturer Part Number=ERJ-2GEJ103X, Supplier Part Number 1=667-ERJ-2GEJ103X, Supplier 1=Mouser
R52 R53: library part CMP-26527-006410-1, "47Ω ±5% 1W 2512 Thick Film Chip Resistor AEC-Q200 compliant", Case Code (Imperial)=2512, Case Code (Metric)=6432, Manufacturer="Stackpole Electronics", Manufacturer Part Number=RMCF2512JT47R0, Max Operating Temperature=155°C, Max Power Dissipation=1W, Min Operating Temperature=-55°C, Ratings=AEC-Q200, Resistor Type="Thick Film", Temperature Coefficient=200ppm/°C, Tolerance=5%, Voltage Rating=200V, Case/Package=2512, Category="Chip SMD Resistors", China RoHS=Non-Compliant, ComponentLink1Description=https://datasheet.octopart.com:443/RMCF2512JT47R0-Stackpole-Electronics-datasheet-182148065.pdf?src-supplier=IHS, ComponentLink1URL=https://datasheet.octopart.com:443/RMCF2512JT47R0-Stackpole-Electronics-datasheet-182148065.pdf?src-supplier=IHS, ComponentLink2Description=https://datasheet.octopart.com:443/RMCF2512JT47R0-Stackpole-Electronics-datasheet-28504820.pdf?src-supplier=Upverter, ComponentLink2URL=https://datasheet.octopart.com:443/RMCF2512JT47R0-Stackpole-Electronics-datasheet-28504820.pdf?src-supplier=Upverter, ComponentLink3Description=https://datasheet.octopart.com:443/RMCF2512JT47R0-Stackpole-Electronics-datasheet-141193804.pdf?src-supplier=Master+Electronics, ComponentLink3URL=https://datasheet.octopart.com:443/RMCF2512JT47R0-Stackpole-Electronics-datasheet-141193804.pdf?src-supplier=Master+Electronics, ComponentLink4Description=https://datasheet.octopart.com:443/RMCF2512JT47R0-Stackpole-Electronics-datasheet-189104163.pdf?src-supplier=Master+Electronics, ComponentLink4URL=https://datasheet.octopart.com:443/RMCF2512JT47R0-Stackpole-Electronics-datasheet-189104163.pdf?src-supplier=Master+Electronics, ComponentLink5Description=https://datasheet.octopart.com:443/RMCF2512JT47R0-Stackpole-Electronics-datasheet-116606903.pdf?src-supplier=Master+Electronics, ComponentLink5URL=https://datasheet.octopart.com:443/RMCF2512JT47R0-Stackpole-Electronics-datasheet-116606903.pdf?src-supplier=Master+Electronics, ComponentLink6Description=https://datasheet.octopart.com:443/RMCF2512JT47R0-Stackpole-Electronics-datasheet-62091608.pdf?src-supplier=Stackpole+Electronics, ComponentLink6URL=https://datasheet.octopart.com:443/RMCF2512JT47R0-Stackpole-Electronics-datasheet-62091608.pdf?src-supplier=Stackpole+Electronics, ComponentLink7Description=https://datasheet.octopart.com:443/RMCF2512JT47R0-Stackpole-Electronics-datasheet-12534581.pdf?src-supplier=Stackpole+Electronics, ComponentLink7URL=https://datasheet.octopart.com:443/RMCF2512JT47R0-Stackpole-Electronics-datasheet-12534581.pdf?src-supplier=Stackpole+Electronics, ComponentLink8Description=https://datasheet.octopart.com:443/RMCF2512JT47R0-Stackpole-Electronics-datasheet-10788263.pdf?src-supplier=Stackpole+Electronics, ComponentLink8URL=https://datasheet.octopart.com:443/RMCF2512JT47R0-Stackpole-Electronics-datasheet-10788263.pdf?src-supplier=Stackpole+Electronics, ComponentLink9Description=https://datasheet.octopart.com:443/RMCF2512JT47R0-Stackpole-Electronics-datasheet-11547379.pdf?src-supplier=Future+Electronics, ComponentLink9URL=https://datasheet.octopart.com:443/RMCF2512JT47R0-Stackpole-Electronics-datasheet-11547379.pdf?src-supplier=Future+Electronics, ComponentLink10Description=https://datasheet.octopart.com:443/RMCF2512JT47R0-Stackpole-Electronics-datasheet-8359789.pdf?src-supplier=Future+Electronics, ComponentLink10URL=https://datasheet.octopart.com:443/RMCF2512JT47R0-Stackpole-Electronics-datasheet-8359789.pdf?src-supplier=Future+Electronics, ComponentLink11Description=https://datasheet.octopart.com:443/RMCF2512JT47R0-Stackpole-Electronics-datasheet-8324226.pdf?src-supplier=Future+Electronics, ComponentLink11URL=https://datasheet.octopart.com:443/RMCF2512JT47R0-Stackpole-Electronics-datasheet-8324226.pdf?src-supplier=Future+Electronics, ComponentLink12Description=https://datasheet.octopart.com:443/RMCF2512JT47R0-Stackpole-Electronics-datasheet-8088878.pdf?src-supplier=Future+Electronics, ComponentLink12URL=https://datasheet.octopart.com:443/RMCF2512JT47R0-Stackpole-Electronics-datasheet-8088878.pdf?src-supplier=Future+Electronics, ComponentLink13Description=https://datasheet.octopart.com:443/RMCF2512JT47R0-Stackpole-Electronics-datasheet-5313682.pdf?src-supplier=Future+Electronics, ComponentLink13URL=https://datasheet.octopart.com:443/RMCF2512JT47R0-Stackpole-Electronics-datasheet-5313682.pdf?src-supplier=Future+Electronics, ComponentLink14Description=http://sigma.octopart.com:80/15940719/materials_sheet/Stackpole-Electronics-RMCF2512JT47R0.pdf?src-supplier=Compliance+Statements, ComponentLink14URL=http://sigma.octopart.com:80/15940719/materials_sheet/Stackpole-Electronics-RMCF2512JT47R0.pdf?src-supplier=Compliance+Statements, ComponentLink15Description=http://sigma.octopart.com:80/141158211/reach_statement/Stackpole-Electronics-RMCF2512JT47R0.pdf?src-supplier=Compliance+Statements, ComponentLink15URL=http://sigma.octopart.com:80/141158211/reach_statement/Stackpole-Electronics-RMCF2512JT47R0.pdf?src-supplier=Compliance+Statements, ComponentLink16Description=http://sigma.octopart.com:80/141158212/rohs_statement/Stackpole-Electronics-RMCF2512JT47R0.pdf?src-supplier=Compliance+Statements, ComponentLink16URL=http://sigma.octopart.com:80/141158212/rohs_statement/Stackpole-Electronics-RMCF2512JT47R0.pdf?src-supplier=Compliance+Statements, Composition="Thick Film", Construction=Rectangular, Contact Plating=Tin, Country of Origin="Japan, Mainland China, Taiwan", Depth=3.2mm, Export Control Classification Number (ECCN) Code=EAR99, Features="Automotive AEC-Q200", Harmonized Tariff Schedule (HTS) Code=8533.21.00.30, Height=0.028inch, Introduction Date=2011-01-07, Lead Free="Lead Free", Length=0.248inch, Lifecycle Status=Production, Military Standard=Not, Mount="Surface Mount", Mounting Technology="Surface Mount", Number of Terminals=2, Number of Terminations=2, Packaging="Tape and Reel", Power Rating=1W, Pricing="4000=0.03536, 8000=0.03484, 16000=0.03432, 32000=0.0338, 64000=0.03328 (USD)", Radiation Hardening=No, REACH SVHC=Yes, Resistance=47R, RoHS=Compliant, RoHS Compliant=Yes, Schedule B="8533210045, 8533210045|8533210045, 8533210045|8533210045|8533210045, 8533210045|8533210045|8533210045|8533210045", Series=RMCF, Stock=96000, Supplier=Avnet, Supplier Part Number=RMCF2512JT47R0, Width=0.126inch, Working Voltage=200V
R54: library part CMP-1012-00736-1, "100K 0.1W 1% 0603 (1608 Metric)  SMD", Case-EIA=0603, Case-Metric=1608, Manufacturer=Vishay, Manufacturer Part Number=CRCW0603100KFKTC, Max Operating Temperature=155°C, Max Power Dissipation=100mW, Min Operating Temperature=-55°C, Power="0.1 W", Ratings=AEC-Q200, Supplier Part Number=CRCW0603100KFKTC-ND, Temperature Coefficient=100ppm/°C, Tolerance="1 %", Working Voltage=75V, Case/Package=0603, Category="Chip SMD Resistors", ComponentLink1Description=https://datasheet.octopart.com:443/CRCW0603100KFKTC-Vishay-datasheet-175863636.pdf?src-supplier=IHS, ComponentLink1URL=https://datasheet.octopart.com:443/CRCW0603100KFKTC-Vishay-datasheet-175863636.pdf?src-supplier=IHS, ComponentLink2Description=https://datasheet.octopart.com:443/CRCW0603100KFKTC-Vishay-datasheet-182027442.pdf?src-supplier=IHS, ComponentLink2URL=https://datasheet.octopart.com:443/CRCW0603100KFKTC-Vishay-datasheet-182027442.pdf?src-supplier=IHS, ComponentLink3Description=https://datasheet.octopart.com/D-CRCW-Lead-%28Pb%29-Bearing-Thick-Film%2C-Rectangular-Chip-Resistors-Vishay-datasheet-family-72.pdf, ComponentLink3URL=https://datasheet.octopart.com/D-CRCW-Lead-%28Pb%29-Bearing-Thick-Film%2C-Rectangular-Chip-Resistors-Vishay-datasheet-family-72.pdf, ComponentLink4Description=https://datasheet.octopart.com/CRCW0603100KFKTC-Vishay-datasheet-13242068.pdf, ComponentLink4URL=https://datasheet.octopart.com/CRCW0603100KFKTC-Vishay-datasheet-13242068.pdf, ComponentLink5Description=https://datasheet.octopart.com/CRCW0603100KFKTC-Vishay-datasheet-13195083.pdf, ComponentLink5URL=https://datasheet.octopart.com/CRCW0603100KFKTC-Vishay-datasheet-13195083.pdf, ComponentLink6Description=https://datasheet.octopart.com/CRCW0603100KFKTC-Vishay-datasheet-13034211.pdf, ComponentLink6URL=https://datasheet.octopart.com/CRCW0603100KFKTC-Vishay-datasheet-13034211.pdf, ComponentLink7Description=https://datasheet.octopart.com/CRCW0603100KFKTC-Vishay-datasheet-12600034.pdf, ComponentLink7URL=https://datasheet.octopart.com/CRCW0603100KFKTC-Vishay-datasheet-12600034.pdf, ComponentLink8Description=https://datasheet.octopart.com/CRCW0603100KFKTC-Vishay-datasheet-12532161.pdf, ComponentLink8URL=https://datasheet.octopart.com/CRCW0603100KFKTC-Vishay-datasheet-12532161.pdf, ComponentLink9Description=https://datasheet.octopart.com/CRCW0603100KFKTC-Vishay-datasheet-12517896.pdf, ComponentLink9URL=https://datasheet.octopart.com/CRCW0603100KFKTC-Vishay-datasheet-12517896.pdf, ComponentLink10Description=https://datasheet.octopart.com/CRCW0603100KFKTC-Vishay-datasheet-12509762.pdf, ComponentLink10URL=https://datasheet.octopart.com/CRCW0603100KFKTC-Vishay-datasheet-12509762.pdf, ComponentLink11Description=https://datasheet.octopart.com/CRCW0603100KFKTC-Vishay-datasheet-10322335.pdf, ComponentLink11URL=https://datasheet.octopart.com/CRCW0603100KFKTC-Vishay-datasheet-10322335.pdf, ComponentLink12Description=https://datasheet.octopart.com/CRCW0603100KFKTC-Vishay-datasheet-8788789.pdf, ComponentLink12URL=https://datasheet.octopart.com/CRCW0603100KFKTC-Vishay-datasheet-8788789.pdf, ComponentLink13Description=https://datasheet.octopart.com/CRCW0603100KFKTC-Vishay-datasheet-8361388.pdf, ComponentLink13URL=https://datasheet.octopart.com/CRCW0603100KFKTC-Vishay-datasheet-8361388.pdf, ComponentLink14Description=https://datasheet.octopart.com/CRCW0603100KFKTC-Vishay-datasheet-5306405.pdf, ComponentLink14URL=https://datasheet.octopart.com/CRCW0603100KFKTC-Vishay-datasheet-5306405.pdf, ComponentLink15Description=https://datasheet.octopart.com/CRCW0603100KFKTC-Vishay-datasheet-546287.pdf, ComponentLink15URL=https://datasheet.octopart.com/CRCW0603100KFKTC-Vishay-datasheet-546287.pdf, ComponentLink16Description=http://sigma.octopart.com:80/rohs_statement/Vishay-company-15.pdf?src-supplier=Compliance+Statements, ComponentLink16URL=http://sigma.octopart.com:80/rohs_statement/Vishay-company-15.pdf?src-supplier=Compliance+Statements, Composition="Thick Film", Contact Plating="Lead, Tin", Features="Automotive AEC-Q200", Height=450µm, Lead Free="Contains Lead", Length=1.55mm, Lifecycle Status=Production, Mounting Technology="Surface Mount", Number of Terminals=2, Number of Terminations=2, Packaging="Tape & Reel", Power Rating=100mW, Pricing="20000=0.01889 (USD)", Radiation Hardening=No, REACH SVHC=No, RoHS=Non-Compliant, Supplier=DigiKey, Technology=SMT, Width=850µm
R55: library part CMP-1012-00736-1, "100K 0.1W 1% 0603 (1608 Metric)  SMD", Case-EIA=0603, Case-Metric=1608, Power="0.1 W", Tolerance="1 %", Technology=SMT
R56 R57: library part CMP-2003-03510-1, Manufacturer=Yageo, Part Number=RC1206JR-1033KL